# Altium PCB DC-DC_Conv_MCU.PcbDoc (part 1 of 2)
Units mm, origin at the board's own origin, x right, y up, seen from the top; angles counter-clockwise.
Board outline 149.01 x 76.01 mm, 2 copper layers (Top Layer, Bottom Layer); 299 components, 168 nets, 857 pads, 0 vias.
Unrouted connection lines stored in the file: 625.
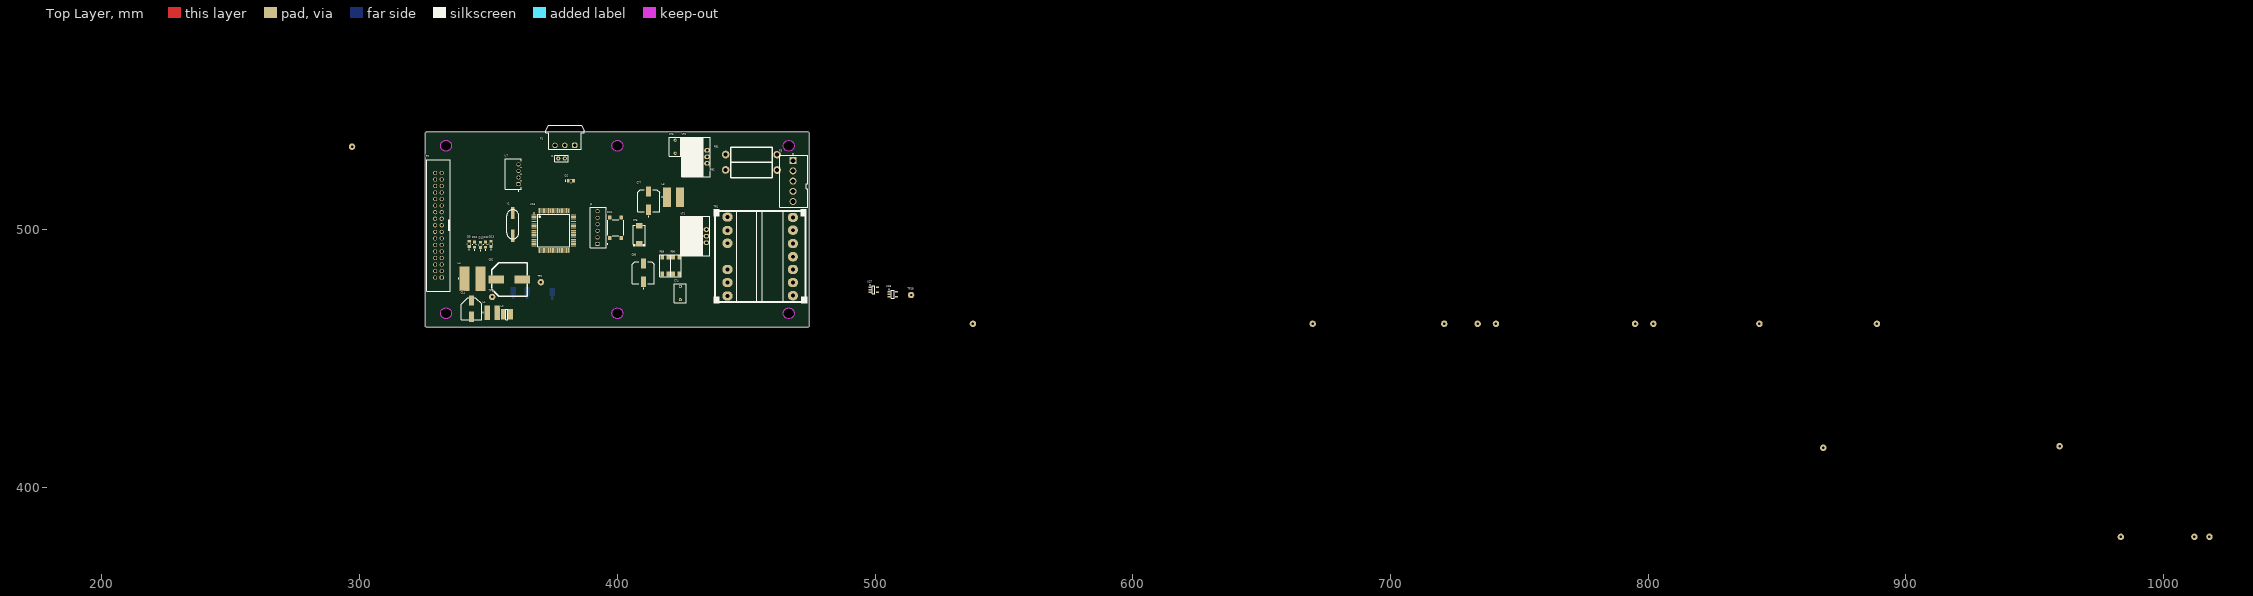
[diagram p0: Top Layer view]
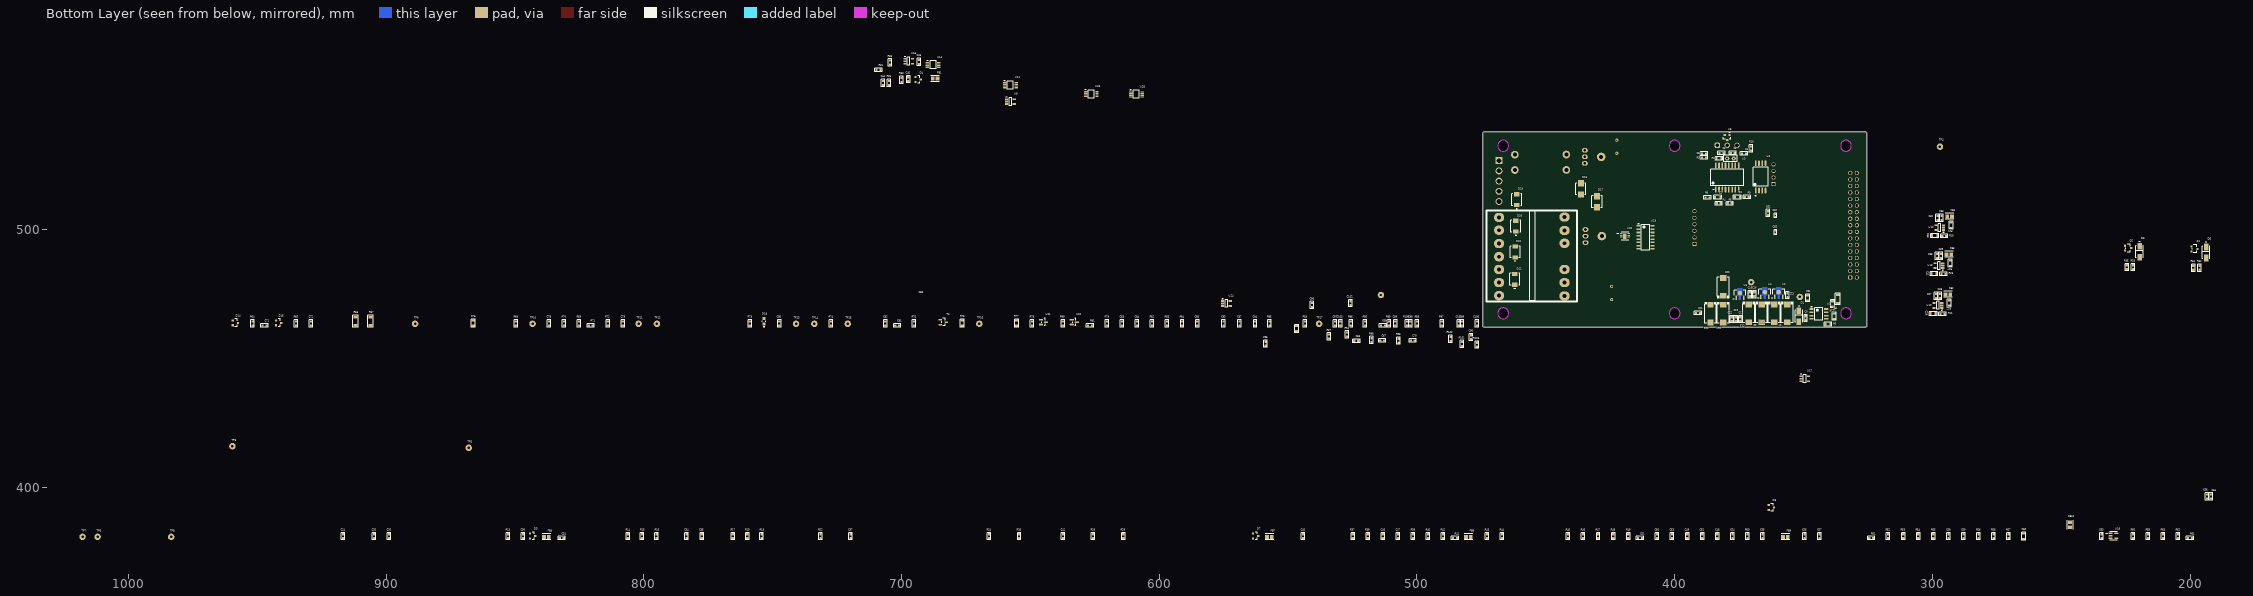
[diagram p1: Bottom Layer view, seen from below]

## Layer stack, top to bottom
Top Solder: solder mask 0.0102, Solder Resist, Dk 3.5
Top Layer: signal copper 0.0356
Dielectric 1: dielectric 0.32, FR-4, Dk 4.8
Bottom Layer: signal copper 0.0356
Bottom Solder: solder mask 0.0102, Solder Resist, Dk 3.5

## Board outline
325.493,462.5 325.493,537.5 325.495,537.505 325.995,538.005 326,538.007 474,538.007 474.005,538.005 474.505,537.505 474.507,537.5 474.507,462.5 474.505,462.495 474.005,461.995 474,461.993 326,461.993 325.995,461.995
cut-out: 466.5,530.4 cw(c466.5,532.5) 464.4,532.5 cw(c466.5,532.5) 466.5,534.6 cw(c466.5,532.5) 468.6,532.5 cw(c466.5,532.5)
cut-out: 466.5,465.4 cw(c466.5,467.5) 464.4,467.5 cw(c466.5,467.5) 466.5,469.6 cw(c466.5,467.5) 468.6,467.5 cw(c466.5,467.5)
cut-out: 400,465.4 cw(c400,467.5) 397.9,467.5 cw(c400,467.5) 400,469.6 cw(c400,467.5) 402.1,467.5 cw(c400,467.5)
cut-out: 400,530.4 cw(c400,532.5) 397.9,532.5 cw(c400,532.5) 400,534.6 cw(c400,532.5) 402.1,532.5 cw(c400,532.5)
cut-out: 333.5,465.4 cw(c333.5,467.5) 331.4,467.5 cw(c333.5,467.5) 333.5,469.6 cw(c333.5,467.5) 335.6,467.5 cw(c333.5,467.5)
cut-out: 333.5,530.4 cw(c333.5,532.5) 331.4,532.5 cw(c333.5,532.5) 333.5,534.6 cw(c333.5,532.5) 335.6,532.5 cw(c333.5,532.5)

## Design rules (kind name [scope] priority, off if disabled: settings)
Clearance [All] p1: gap=0.1 ignorepadtopadclearanceinfootprint=FALSE except(0.15: Arc-Arc Arc-Track Arc-Fill Arc-Poly Arc-Region Track-Track Track-Fill Track-Poly Track-Region)
PolygonConnect [All] p1: connectstyle=Relief reliefconductorwidth=0.254 reliefentries=4 polygonreliefangle="90 Angle" airgapwidth=0.254
RoutingVias [All] p1: holewidth=0.711 width=1.27 viastyle="Through Hole" minholewidth=0.711 minwidth=1.27 maxholewidth=0.711 maxwidth=1.27
SolderMaskExpansion [All] p1: expansion=0.102 istentingtop=FALSE
SupplyNets "Schematic Supply Nets_9" [InNet('+3V3')] p1: voltage=0.000
SupplyNets "Schematic Supply Nets_8" [InNet('VCC')] p2: voltage=0.000
SupplyNets "Schematic Supply Nets_7" [InNet('GND_ISOL')] p3: voltage=0.000
SupplyNets "Schematic Supply Nets_6" [InNet('+3V3_MCU')] p4: voltage=0.000
SupplyNets "Schematic Supply Nets_5" [InNet('3v3')] p5: voltage=0.000
SupplyNets "Schematic Supply Nets_4" [InNet('GND')] p6: voltage=0.000
SupplyNets "Schematic Supply Nets_3" [InNet('+5')] p7: voltage=0.000
SupplyNets "Schematic Supply Nets_1" [InNet('+5V')] p8: voltage=0.000
SupplyNets "Schematic Supply Nets" [InNet('+12')] p9: voltage=0.000
Width [All] p1: maxlimit=0.254 minlimit=0.254 preferedwidth=0.254
30 further rules are at their usual default settings.

## Components (designator, comment, footprint, x,y, rotation, side; value= is the part's Value field where it differs from the comment)
C1 "0.01uF" CAP-0805 375.666,512.572 r180 bottom
C2 "2.2uF" CAP-0805 383.286,512.445 r0 bottom
C3 "10nF" CAP-0603 377.444,529.717 r180 bottom
C4 "100nF" CAP-0603 373.126,529.463 r180 bottom
C5 "1nF" CAP-0603 381.762,529.717 r180 bottom
C6 "1uF" CAP-0603 388.62,529.463 r180 bottom
C7 "100uF_16V" CAP-TAN-D 356.362,467.487 r270 bottom
C8 "100uF_16V" CAP-TAN-D 366.268,467.487 r270 bottom
C9 "470pF" CAP-0603 349.123,465.582 r270 bottom
C10 "100uF_16V" CAP-TAN-D 361.315,467.487 r270 bottom
C11 "0.1uF" CAP-0603 374.523,465.201 r90 bottom
C12 "0.1uF" CAP-0603 356.235,474.472 r270 bottom
C13 "100uF_16V" CAP-TAN-D 371.221,467.487 r270 bottom
C14 "330uF 25V" CAP_SMD_Size_E 343.408,469.265 r90 top
C15 "0.47uF" CAP-0805 338.709,471.17 r270 bottom
C16 "0.1uF" CAP-0603 369.062,474.853 r90 bottom
C17 "100uF_16V" CAP-TAN-D 381.127,467.36 r270 bottom
C18 "0.1uF" CAP-0603 370.84,474.853 r90 bottom
C19 "0.1uF" CAP-0603 376.174,465.201 r90 bottom
C20 "100uF_16V" CAP-TAN-D 381.127,477.774 r90 bottom
C21 "0.1uF" CAP-0603 390.906,467.614 r180 bottom
C22 "0.1uF" CAP-0603 377.825,465.201 r90 bottom
C23 "100uF_16V" CAP-TAN-D 386.08,467.36 r270 bottom
C24 "0.1uF" CAP-0603 916.686,381 r90 bottom
C25 "1uF" CAP-0603 904.621,381 r90 bottom
C26 "0.1uF" CAP-0603 898.779,381 r90 bottom
C27 "0.01uF" CAP-0603 298.577,474.218 r90 bottom
C28 "2.2uF" CAP-0603 297.053,474.218 r90 bottom
C29 "1nF" CAP-0805 299.72,467.36 r180 bottom
C30 "0.1uF" CAP-0603 846.836,381 r90 bottom
C31 "1uF" CAP-0603 831.85,380.238 r180 bottom
C32 "0.01uF" CAP-0603 297.942,504.444 r90 bottom
C33 "2.2uF" CAP-0603 296.418,504.444 r90 bottom
C34 "330pF" CAP-0603 783.336,381 r90 bottom
C35 "330pF" CAP-0603 777.494,381 r90 bottom
C36 "1nF" CAP-0805 299.085,497.586 r180 bottom
C37 "1uF" CAP-0603 719.709,381 r90 bottom
C38 "0.01uF" CAP-0603 298.196,489.712 r90 bottom
C39 "2.2uF" CAP-0603 296.672,489.712 r90 bottom
C40 "330pF" CAP-0603 697.357,558.292 r90 bottom
C41 "1nF" CAP-0805 299.339,482.854 r180 bottom
C42 "330pF" CAP-0603 637.286,381 r90 bottom
C43 "0.1uF" CAP-0603 693.166,565.023 r90 bottom
C44 "1uF" CAP-0603 707.136,556.895 r90 bottom
C45 "0.1uF" CAP-0603 544.195,381 r90 bottom
C46 "1uF" CAP-0603 513.207,381 r90 bottom
C47 "0.1uF" CAP-0603 507.365,381 r90 bottom
C48 "100nF" CAP-0603 383.413,381 r90 bottom
C49 "100nF" CAP-0603 395.097,381 r90 bottom
C50 "100nF" CAP-0603 406.781,381 r90 bottom
C51 "1uF" CAP-0603 413.385,380.238 r180 bottom
C52 "100nF" CAP-0603 389.255,381 r90 bottom
C53 "100nF" CAP-0603 400.939,381 r90 bottom
C54 "100nF" CAP-0603 377.571,381 r90 bottom
C55 "1uF" CAP-0603 365.887,381 r90 bottom
C56 "330pF" CAP-0603 349.631,381 r90 bottom
C57 "0.1uF" CAP-0603 343.789,381 r90 bottom
C58 "330pF" CAP-0603 293.751,381 r90 bottom
C59 "0.1uF" CAP-0603 287.909,381 r90 bottom
C60 "2.2uF" CAP-0805 264.541,381 r90 bottom
C61 "100nF" CAP-0603 363.728,506.349 r270 bottom
C62 "16pF" CAP-0402 360.934,505.46 r90 bottom
C63 "1uF" CAP-0603 234.315,381 r90 bottom
C64 "0.1uF" CAP-0603 191.897,396.367 r90 bottom
C65 "16pF" CAP-0402 360.934,498.975 r90 bottom
C66 "0.1uF" CAP-0603 193.421,396.367 r90 bottom
C67 "1uF" CAP-0603 513.461,456.946 r180 bottom
C68 "1uF" CAP-0603 523.507,456.819 r180 bottom
C69 "0.1uF" CAP-0603 513.207,462.788 r180 bottom
C70 "0.1uF" CAP-0603 501.637,456.946 r180 bottom
C71 "10nF" CAP-0603 947.166,462.788 r180 bottom
C72 "10nF" CAP-0603 929.132,463.55 r90 bottom
C73 "63V 0.01UF" FKP2D011001A00JSSD 422.402,532.13 r90 top
C74 "63V 0.01UF" FKP2D011001A00JSSD 424.434,475.361 r90 top
C75 "100uF_16V" CAP-TAN-D 408.432,497.967 r90 top
C76 "0.01uF" CAP-0805 866.14,463.677 r90 bottom
C77 "330uF_25V" CAP_SMD_Size_G 412.115,511.175 r90 top
C78 "0.1uF" CAP-0603 836.803,463.55 r90 bottom
C79 "100nF" CAP-0603 808.101,463.55 r90 bottom
C80 "100nF" CAP-0603 747.395,463.55 r90 bottom
C81 "0.1uF" CAP-0603 701.675,462.788 r180 bottom
C82 "0.01uF" CAP-0603 706.247,463.55 r90 bottom
C83 "100nF" CAP-0603 614.426,463.55 r90 bottom
C84 "2.2nF" CAP-0603 608.584,463.55 r90 bottom
C85 "0.01uF" CAP-0603 585.216,463.55 r90 bottom
C86 "470uF_25V" CAP_SMD_Size_G 410.083,483.235 r90 top
C87 "100nF" CAP-0603 568.833,463.55 r90 bottom
C88 "100nF" CAP-0805 546.608,461.534 r90 bottom
C89 "470 pF" CAP-0603 482.473,463.55 r90 bottom
C90 "0.47uF" CAP-0603 479.044,458.216 r90 bottom
C91 "0.1uF" CAP-0805 348.361,473.456 r270 bottom
C92 "1000uF_25V" CAP_SMD_SIZE_H 358.013,480.568 r180 top
C93 "1uF" CAP-0603 575.056,463.55 r90 bottom
C94 "0.1uF" CAP-0603 562.737,463.55 r90 bottom
C95 "1uF" CAP-0603 558.673,455.676 r90 bottom
C96 "330pF" CAP-0603 540.639,470.662 r90 bottom
C97 "330pF" CAP-0603 531.749,463.55 r90 bottom
C98 "0.1uF" CAP-0603 502.539,463.55 r90 bottom
C99 "1uF" CAP-0603 508.381,463.55 r90 bottom
C100 "0.1uF" CAP-0603 476.631,463.55 r90 bottom
C101 "1uF" CAP-0603 483.743,463.55 r90 bottom
C102 "0.1uF" CAP-0603 525.78,471.411 r90 bottom
C103 "1uF" CAP-0603 529.717,463.55 r90 bottom
D1 "ES1G" FP-403AE-MFG 351.79,466.344 r270 bottom
D2 "LED_BLUE" LED_BLUE 381.982,518.922 r0 top
D3 "BAT54S-7-F" FP-SOT23-MFG#1 843.153,381.127 r180 bottom
D4 "BAT54S-7-F" FP-SOT23-MFG#1 693.547,558.165 r180 bottom
D5 "SS14" DO-214-AC 193.802,491.109 r90 bottom
D6 "SS14" DO-214-AC 219.583,491.363 r90 bottom
D7 "BAT54S-7-F" FP-SOT23-MFG#1 562.61,381.127 r180 bottom
D8 "BAT54S-7-F" FP-SOT23-MFG#1 362.458,392.176 r180 bottom
D9 "LED_GREEN" LED_GREEN 342.519,494.411 r90 top
D10 "LED_GREEN" LED_GREEN 344.551,494.157 r90 top
D11 "LED_RED" LED_RED 346.964,494.03 r90 top
D12 "LED_RED" LED_RED 348.869,494.157 r90 top
D13 "LED_YELLOW" LED_YELLOW 351.028,494.411 r90 top
D14 "BAT54S-7-F" FP-SOT23-MFG#1 958.469,463.804 r180 bottom
D15 "BAT54S-7-F" FP-SOT23-MFG#1 941.705,463.804 r180 bottom
D16 "SMBJ33CA-13-F" FP-SMB-CA-MFG 436.372,515.747 r90 bottom
D17 "SMBJ33CA-13-F" FP-SMB-CA-MFG 430.149,510.794 r90 bottom
D18 "LED_RED" LED_RED 753.364,464.439 r90 bottom
D19 "STTH212U" FP-SMB-MFG 461.264,511.605 r90 bottom
D20 "STTH212U" FP-SMB-MFG 461.645,501.318 r90 bottom
D21 "STTH212U" FP-SMB-MFG 462.026,480.695 r90 bottom
D22 "STTH212U" FP-SMB-MFG 461.899,491.285 r90 bottom
FB1 "BLM21PG221SN1D" FP-BLM21-0_2-t0_85-e0_5-IPC_A 686.943,558.546 r180 bottom
FB2 "BLM21PG221SN1D" FP-BLM21-0_2-t0_85-e0_5-IPC_A 293.968,474.853 r180 bottom
FB3 "BLM21PG221SN1D" FP-BLM21-0_2-t0_85-e0_5-IPC_A 837.819,380.746 r180 bottom
FB4 "BLM21PG221SN1D" FP-BLM21-0_2-t0_85-e0_5-IPC_A 293.333,505.079 r180 bottom
FB5 "BLM21PG221SN1D" FP-BLM21-0_2-t0_85-e0_5-IPC_A 293.587,490.347 r180 bottom
FB7 "BLM21PG221SN1D" FP-BLM21-0_2-t0_85-e0_5-IPC_A 557.276,380.746 r180 bottom
FB8 "BLM21PG221SN1D" FP-BLM21-0_2-t0_85-e0_5-IPC_A 480.06,380.746 r180 bottom
FB9 "BLM21PG221SN1D" FP-BLM21-0_2-t0_85-e0_5-IPC_A 356.997,380.746 r180 bottom
FB10 "BLM21PG221SN1D" FP-BLM21-0_2-t0_85-e0_5-IPC_A 246.507,385.445 r90 bottom
J1 "Jumper 1x2.54" Jumper_2.54 378.333,527.558 r180 top
J2 "KF2510 Connector 2.54mm" Sullins_SWR25X-NRTC-S06-ST-BA_MFG 392.603,500.761 r90 top
L1 "470µH" WE-PD2_5848 351.409,467.741 r0 top
L2 "220uH" Coil_4.5x4.5_mm 357.124,467.106 r0 top
L3 "330µH, 0.38A" WE-PD2_7850 421.767,512.572 r0 top
L4 "27µH, 1.95A" WE-PD2_1054 343.789,480.949 r0 top
P1 "691305340003" 691305340003 379.603,535.838 r180 top
P2 "61203421621" 61203421621 330.581,501.65 r90 top
P3 "645005114822" 645005114822 468.376,518.795 r90 top
Q1 "AO3400A" FP-SOT23-MFG#2 198.247,492.506 r180 bottom
Q2 "AO3400A" FP-SOT23-MFG#2 224.028,492.76 r180 bottom
R1 "0.33" RES-1206 336.677,473.075 r270 bottom
R2 "120" RES-0805 382.778,527.558 r180 bottom
R3 "10K" RES-0603 388.62,527.939 r0 bottom
R4 "10K" RES-0603 382.905,510.159 r180 bottom
R5 "10K" RES-0603 378.587,510.159 r180 bottom
R6 "6.8K" RES-0805 340.487,463.296 r180 bottom
R7 "1.2K" RES-0805 338.074,466.344 r270 bottom
R8 "220" RES-0603 387.223,512.445 r180 bottom
R9 "10K" RES-0603 371.983,512.572 r180 bottom
R10 "10K" RES-0603 370.332,531.495 r90 bottom
R11 "100" RES-0603 296.037,467.233 r180 bottom
R12 "100K" RES-0805 293.37,471.424 r270 bottom
R13 "6.6K 1%" RES-0603 852.678,381 r90 bottom
R14 "50" RES-0603 806.196,381 r90 bottom
R15 "10K 1%" RES-0603 800.608,381 r90 bottom
R16 "10K 1%" RES-0603 795.02,381 r90 bottom
R17 "10K 1%" RES-0603 765.429,381 r90 bottom
R18 "6.6K 1%" RES-0603 754.253,381 r90 bottom
R19 "20K  1%" RES-0603 759.841,381 r90 bottom
R20 "100" RES-0603 295.402,497.459 r180 bottom
R21 "100K" RES-0805 292.735,501.65 r270 bottom
R22 "10K" RES-0603 731.393,381 r90 bottom
R23 "100" RES-0603 295.656,482.727 r180 bottom
R24 "6.6K 1%" RES-0603 665.988,381 r90 bottom
R25 "50" RES-0603 704.85,556.895 r90 bottom
R26 "10K 1%" RES-0603 654.304,381 r90 bottom
R27 "100K" RES-0805 292.989,486.918 r270 bottom
R28 "10K 1%" RES-0603 625.602,381 r90 bottom
R29 "10K 1%" RES-0603 613.918,381 r90 bottom
R30 "20K  1%" RES-0603 700.024,558.038 r90 bottom
R31 "6.6K 1%" RES-0603 708.914,561.975 r180 bottom
R32 "100" RES-0603 196.342,485.14 r90 bottom
R33 "100" RES-0603 222.123,485.394 r90 bottom
R34 "10K" RES-0603 198.755,485.14 r90 bottom
R35 "10K" RES-0603 224.536,485.394 r90 bottom
R36 "10K" RES-0603 704.469,564.769 r90 bottom
R37 "10K" RES-0603 524.891,381 r90 bottom
R38 "6.6K 1%" RES-0603 519.049,381 r90 bottom
R39 "50" RES-0603 501.523,381 r90 bottom
R40 "27" RES-0603 495.681,381 r90 bottom
R41 "10K 1%" RES-0603 485.267,380.238 r180 bottom
R42 "10K 1%" RES-0603 489.839,381 r90 bottom
R43 "27" RES-0603 472.821,381 r90 bottom
R44 "27" RES-0603 466.979,381 r90 bottom
R45 "27" RES-0603 441.325,381 r90 bottom
R46 "27" RES-0603 435.483,381 r90 bottom
R47 "27" RES-0603 429.641,381 r90 bottom
R48 "27" RES-0603 423.799,381 r90 bottom
R49 "27" RES-0603 417.957,381 r90 bottom
R50 "10K 1%" RES-0603 371.729,381 r90 bottom
R51 "20K  1%" RES-0603 323.723,380.238 r180 bottom
R52 "20K" RES-0603 317.119,381 r90 bottom
R53 "6.6K 1%" RES-0603 311.277,381 r90 bottom
R54 "10K" RES-0603 305.435,381 r90 bottom
R55 "10K" RES-0603 299.593,381 r90 bottom
R56 "6.6K 1%" RES-0603 282.067,381 r90 bottom
R57 "50" RES-0603 270.383,381 r90 bottom
R58 "10K 1%" RES-0603 276.225,381 r90 bottom
R59 "220" RES-0603 216.281,381 r90 bottom
R60 "220" RES-0603 222.123,381 r90 bottom
R61 "220" RES-0603 200.025,380.238 r180 bottom
R62 "220" RES-0603 204.597,381 r90 bottom
R63 "220" RES-0603 210.439,381 r90 bottom
R64 "10K" RES-0603 951.738,463.55 r90 bottom
R65 "10K" RES-0603 934.974,463.55 r90 bottom
R66 "10 OMH" RES-1206 911.86,464.439 r90 bottom
R67 "10 OMH" RES-1206 906.018,464.439 r90 bottom
R68 "10K" RES-0603 849.63,463.55 r90 bottom
R69 "2K" RES-0603 825.119,463.55 r90 bottom
R70 "2K" RES-0603 830.961,463.55 r90 bottom
R71 "820" RES-0603 820.547,462.788 r180 bottom
R72 "200K" RES-0603 813.943,463.55 r90 bottom
R73 "200K" RES-0603 758.825,463.55 r90 bottom
R74 "1K" RES-0603 727.329,463.55 r90 bottom
R75 "1K" RES-0603 695.071,463.55 r90 bottom
R76 "10" RES-0805 676.402,463.677 r90 bottom
R77 "10" RES-0805 655.32,463.677 r90 bottom
R78 "10K" RES-0603 649.351,463.55 r90 bottom
R79 "10K" RES-0603 620.268,463.55 r90 bottom
R80 "6.2K" RES-0603 637.413,463.55 r90 bottom
R81 "10" RES-0603 626.872,462.788 r180 bottom
R82 "2K" RES-0603 602.742,463.55 r90 bottom
R83 "1K" RES-0603 596.9,463.55 r90 bottom
R84 "1K" RES-0603 591.058,463.55 r90 bottom
R85 "10" RES-0603 557.149,463.55 r90 bottom
R86 "1K" RES-0603 525.653,463.55 r90 bottom
R87 "1K" RES-0603 534.162,458.47 r90 bottom
R88 "1K" RES-0603 499.999,463.55 r90 bottom
R89 "4" RES-2512 418.592,486.029 r90 top
R90 "4" RES-2512 422.783,486.029 r90 top
R91 "RES_100" RES-2W 452.12,529.082 r180 top
R92 "RES_100" RES-2W 452.12,523.113 r180 top
R93 "10K 1%" RES-0603 543.433,463.55 r90 bottom
R94 "10K 1%" RES-0603 527.05,459.232 r90 bottom
R95 "20K  1%" RES-0603 520.065,463.55 r90 bottom
R96 "6.6K 1%" RES-0603 507.111,456.819 r90 bottom
R97 "10K" RES-0603 490.347,463.55 r90 bottom
R98 "10K" RES-0603 517.652,457.073 r90 bottom
R99 "10K" RES-0603 510.921,463.55 r90 bottom
R100 "10K" RES-0603 503.809,463.55 r90 bottom
R101 "10K" RES-0603 482.473,455.549 r90 bottom
R102 "10K" RES-0603 486.918,457.581 r90 bottom
R103 "15K" RES-0603 476.631,455.295 r90 bottom
SW1 "430152050826" 430152050826 399.288,500.634 r90 top
T2 "BC847C" SOT23-3_IPC_A 683.768,464.058 r180 bottom
TP1 "Test_Point_PCB" Test_Point 351.409,473.837 r0 top
TP2 "Test_Point_PCB" Test_Point 370.332,479.552 r0 top
TP3 "Test_Point_PCB" Test_Point 959.612,415.925 r180 bottom
TP4 "Test_Point_PCB" Pin_Test_Point(Orange) 297.053,532.13 r180 bottom
TP5 "Test_Point_PCB" Test_Point 867.918,415.29 r180 bottom
TP6 "Test_Point_PCB" Test_Point 1011.936,380.746 r180 bottom
TP7 "Test_Point_PCB" Test_Point 1017.778,380.746 r180 bottom
TP8 "Test_Point_PCB" Test_Point 983.361,380.746 r180 bottom
TP9 "Test_Point_PCB" Test_Point 888.746,463.423 r180 bottom
TP10 "Test_Point_PCB" Test_Point 843.153,463.423 r90 bottom
TP11 "Test_Point_PCB" Test_Point 802.005,463.423 r90 bottom
TP12 "" Test_Point 794.893,463.423 r90 bottom
TP13 "" Test_Point 740.918,463.423 r90 bottom
TP14 "" Test_Point 733.806,463.423 r90 bottom
TP15 "" Test_Point 720.852,463.423 r90 bottom
TP16 "" Test_Point 669.798,463.423 r90 bottom
TP17 "" Test_Point 537.972,463.423 r90 bottom
TP18 "" Test_Point 513.969,474.599 r90 top
TR1 "Transformer 2xI , 1xII" TRANS_ETD_29 455.168,488.823 r0 top
U1 "MC34063" SOIC-8_M 344.043,467.233 r180 bottom
U2 "AMS1117-3.3" SOT-89 359.64,475.745 r180 bottom
U3 "ADM2687E" ADI-RI-16-2_M 379.603,520.192 r90 bottom
U4 "AMS1117-3.3" SOT-89 364.998,475.742 r180 bottom
U5 "PSM712-LF-T7" PRKT-SOT23-3_V 379.603,535.686 r270 bottom
U6 "AMS1117-5" SOT-89 374.65,475.361 r180 bottom
U7 "B0505S-1W" B0505S-1W 359.537,521.462 r90 top
U8 "ISO1042BDWV" FP-DWV0008A-IPC_A 366.649,520.446 r90 bottom
U9 "OPA320AIDBVT" DBV0005A_M 657.733,549.656 r180 bottom
U10 "OPA320AIDBVT" DBV0005A_M 297.815,470.535 r0 bottom
U11 "OPA2376AIDGKR" DGK0008A_N 657.733,556.006 r180 bottom
U12 "OPA320AIDBVT" DBV0005A_M 297.18,500.761 r0 bottom
U13 "OPA320AIDBVT" DBV0005A_M 297.434,486.029 r0 bottom
U14 "OPA2376AIDGKR" DGK0008A_N 687.705,563.88 r180 bottom
U15 "OPA320AIDBVT" DBV0005A_M 697.23,565.277 r180 bottom
U16 "STM32G474VET6" FP-LQFP100-1L-IPC_A 375.285,499.618 r0 top
U17 "OPA320AIDBVT" DBV0005A_M 349.504,442.087 r180 bottom
U18 "REF2033AIDDCT" FP-DDC0005A-IPC_B 229.743,381.127 r180 bottom
U19 "TL494CDR" D0016A_N 411.284,496.951 r180 bottom
U20 "UCC27524DSDR" FP-DSD0008D-IPC_A 419.3,497.418 r180 bottom
U21 "TL431" TL431_SOT-23-3(A) 644.906,464.058 r180 bottom
U22 "TL431" TL431_SOT-23-3(A) 632.968,464.058 r180 bottom
U23 "OPA2376AIDGKR" DGK0008A_N 626.364,552.577 r180 bottom
U24 "OPA320AIDBVT" DBV0005A_M 573.913,471.297 r180 bottom
U25 "OPA2376AIDGKR" DGK0008A_N 608.838,552.45 r180 bottom
U26 "OPA320AIDBVT" DBV0005A_M 506.857,474.853 r0 top
U27 "OPA320AIDBVT" DBV0005A_M 499.442,476.631 r0 top
VT1 "MOSFET-N-GDS" TO-220_Bended_Rad 431.546,497.967 r90 top
VT2 "MOSFET-N-GDS" TO-220_Bended_Rad 431.8,528.701 r90 top
Y1 "XTAL 16Mhz" HC-49_SMD 359.41,502.031 r90 top

## Footprints (in the part's own frame and the unit in brackets; to place one, negate y for a bottom-side part, rotate by r counter-clockwise, add the part's x,y. Pads: shape width x height; smd on the part's side, far side on the other; paste and mask are expansions set on the pad)
61203421621 [mm] "34 pins, straight, gold plating"
  rrect50% 1.6x1.6 hole 1.1: 1(-20.32,-1.27)
  round 1.6 hole 1.1: 2(-20.32,1.27) 3(-17.78,-1.27) 4(-17.78,1.27) 5(-15.24,-1.27) 6(-15.24,1.27) 7(-12.7,-1.27) 8(-12.7,1.27) 9(-10.16,-1.27) 10(-10.16,1.27) 11(-7.62,-1.27) 12(-7.62,1.27) 13(-5.08,-1.27) 14(-5.08,1.27) 15(-2.54,-1.27) 16(-2.54,1.27) 17(0,-1.27) 18(0,1.27) 19(2.54,-1.27) 20(2.54,1.27) 21(5.08,-1.27) 22(5.08,1.27) 23(7.62,-1.27) 24(7.62,1.27) 25(10.16,-1.27) 26(10.16,1.27) 27(12.7,-1.27) 28(12.7,1.27) 29(15.24,-1.27) 30(15.24,1.27) 31(17.78,-1.27) 32(17.78,1.27) 33(20.32,-1.27) 34(20.32,1.27)
  silkscreen extent -25.52,-4.5 25.52,4.5, body extent -25.42,-4.42 25.42,4.75, height 9.13
430152050826 [mm] "SMD Tact Switch, body 6x6mm"
  rect 1.55x1.3 smd: A1(-3.975,2.25) A2(3.975,2.25) B1(-3.975,-2.25) B2(3.975,-2.25)
  silkscreen extent -3.1,-3.1 3.1,3.1, body extent -4.5,-3.1 4.5,3.1, height 5
645005114822 [mm] "3.96mm Male Locking Header, 5p"
  rect 2.7x2.7 hole 1.8: 1(7.92,0.225)
  round 2.7 hole 1.8: 2(3.96,0.225) 3(0,0.225) 4(-3.96,0.225) 5(-7.92,0.225)
  silkscreen extent -10.07,-5.45 10.66,5.45, body extent -9.96,-5.38 9.96,5.38, height 13.89
691305340003 [mm] "Horizontal PCB Header with Plastic Latch, pitch 3.81mm, 03p"
  rrect50% 2.1x2.1 hole 1.4: 1(-3.81,3.2)
  round 2.1 hole 1.4: 2(0,3.2) 3(3.81,3.2)
  silkscreen extent -7.47,-4.6 7.47,4.6, body extent -7.46,-4.6 7.46,4.6, height 7.25
ADI-RI-16-2_M [mm] "ADI-RI-16-2_M"
  oval 2.3x0.65 smd: 1(-4.7,4.445) 2(-4.7,3.175) 3(-4.7,1.905) 4(-4.7,0.635) 5(-4.7,-0.635) 6(-4.7,-1.905) 7(-4.7,-3.175) 8(-4.7,-4.445) 9(4.7,-4.445) 10(4.7,-3.175) 11(4.7,-1.905) 12(4.7,-0.635) 13(4.7,0.635) 14(4.7,1.905) 15(4.7,3.175) 16(4.7,4.445)
  silkscreen extent -4.82,-6.45 3.15,6.45, body extent -3.8,-6.45 3.8,6.45, height 2.64
B0505S-1W [mm]
  rect 1.55x1.55 hole 1 paste-2539.97 mask+0: 1(-3.81,-2.1)
  round 1.55 hole 1 paste-2539.97 mask+0: 2(-1.27,-2.1) 3(1.27,-2.1) 4(3.81,-2.1)
  silkscreen extent -6.52,-3.13 5.92,3.13, body extent -5.8,-3 5.8,3, height 10.41
CAP-0402 [mm]
  rect 0.5x0.6 smd: 1(-0.5,0) 2(0.5,0)
  silkscreen extent -0.95,-0.5 0.95,0.5, body extent -0.52,-0.27 0.53,0.28, height 0.55
CAP-0603 [mm]
  rect 0.85x0.9 smd: 1(-0.775,0) 2(0.775,0)
  silkscreen extent -1.43,-0.67 1.43,0.67, body extent -0.8,-0.4 0.8,0.4, height 0.8
CAP-0805 [mm]
  rect 0.8x1.25 smd mask+0.015: 1(-1,0) 2(1,0)
  silkscreen extent -1.52,-0.76 1.52,0.76, body extent -1,-0.62 1,0.63, height 0.8
CAP-TAN-D [mm]
  rect 2.2x2.5 smd: 1(-3.45,0) 2(3.45,0)
  silkscreen extent -4.5,-2.4 3.65,2.4, body extent -3.8,-2.3 3.8,2.3, height 4
CAP_SMD_Size_E [mm]
  rect 4x2 smd: 1(3.175,0) 2(-3.048,0)
  silkscreen extent -4.19,-3.94 4.32,4.06, body extent -4.25,-4 4.25,4, height 10.59
CAP_SMD_Size_G [mm]
  rect 4x2 smd paste+0 mask+0: 1(3.55,0) 2(-3.55,0)
  silkscreen extent -6.27,-4.25 4.25,4.25, body extent -5.8,-4.5 5.8,4.5, height 0.25
CAP_SMD_SIZE_H [mm]
  rect 6x3 smd: 1(5,0) 2(-5,0)
  silkscreen extent -6.99,-6.48 6.73,6.48, body extent -7,-6.44 7,6.44, height 13.62
Coil_4.5x4.5_mm [mm]
  rect 1.8x4 smd: 1(-1.397,0) 2(1.397,0)
  silkscreen extent -0.38,-2.03 0.38,2.03, body extent -2.07,-2.07 2.07,2.07, height 2.8
D0016A_N [mm] "SOIC, 16-Leads, Body 10x4mm, Pitch 1.27mm, IPC Medium Density"
  rrect17% 1.45x0.6 smd: 1(-2.725,4.445) 2(-2.725,3.175) 3(-2.725,1.905) 4(-2.725,0.635) 5(-2.725,-0.635) 6(-2.725,-1.905) 7(-2.725,-3.175) 8(-2.725,-4.445) 9(2.725,-4.445) 10(2.725,-3.175) 11(2.725,-1.905) 12(2.725,-0.635) 13(2.725,0.635) 14(2.725,1.905) 15(2.725,3.175) 16(2.725,4.445)
  silkscreen extent -2.85,-5 1.6,5.42, body extent -3,-4.95 3,4.95, height 1.59
DBV0005A_M [mm] "SOT23, 5-Leads, Body 3.05x1.75mm, Pitch 0.95mm, IPC Low Density"
  rrect15% 1.2x0.65 smd: 1(-1.475,0.95) 2(-1.475,0) 3(-1.475,-0.95) 4(1.475,-0.95) 5(1.475,0.95)
  silkscreen extent -1.6,-1.55 0.5,1.95, body extent -1.42,-1.46 1.42,1.46, height 1.08
DGK0008A_N [mm] "TSOP, 8-Leads, Body 3.1x3.1mm, Pitch 0.65mm, IPC Medium Density"
  rrect22% 1.35x0.45 smd: 1(-2.225,0.975) 2(-2.225,0.325) 3(-2.225,-0.325) 4(-2.225,-0.975) 5(2.225,-0.975) 6(2.225,-0.325) 7(2.225,0.325) 8(2.225,0.975)
  silkscreen extent -2.35,-1.55 1.15,1.9, body extent -2.45,-1.5 2.45,1.5, height 0.94
DO-214-AC [mm]
  rect 2.65x1.75 smd paste+0 mask+0: 1(-2.15,0) 2(2.15,0)
  silkscreen extent -2.37,-1.48 4.17,1.48, body extent -2.6,-1.36 2.6,1.36, height 2.5
FKP2D011001A00JSSD [mm] "FKP2D011001A00JSSD"
  round 1.224 hole 0.6: 1(-2.54,0) 2(2.54,0)
  silkscreen extent -3.68,-2.29 3.68,2.29, body extent -3.6,-2.25 3.6,2.25, height 6
FP-403AE-MFG [mm]
  rect 2.65x1.75 smd paste+0 mask+0: 1(-2.15,0) 2(2.15,0)
  silkscreen extent -4.17,-1.48 2.37,1.48, body extent -2.6,-1.36 2.6,1.36, height 2.5
FP-BLM21-0_2-t0_85-e0_5-IPC_A [mm]
  rect 1.455x1.556 smd paste+0 mask+0: 1(-0.926,0) 2(0.926,0)
  silkscreen extent -1.65,-1.18 1.65,1.18, body extent -1,-0.63 1,0.63, height 1.05
FP-DDC0005A-IPC_B [mm]
  rect 1.554x0.572 smd paste+0 mask+0: 1(-1.1,0.95)
  rrect100% 1.554x0.572 smd paste+0 mask+0: 2(-1.1,0) 3(-1.1,-0.95) 4(1.1,-0.95) 5(1.1,0.95)
  silkscreen extent -2.7,-1.7 1.4,1.7, body extent -1.4,-1.45 1.4,1.45, height 1.1
FP-DSD0008D-IPC_A [mm]
  rect 1.057x0.309 smd paste+0 mask+0: 1(-1.451,0.975)
  rrect100% 1.057x0.309 smd paste+0 mask+0: 2(-1.451,0.325) 3(-1.451,-0.325) 4(-1.451,-0.975) 5(1.451,-0.975) 6(1.451,-0.325) 7(1.451,0.325) 8(1.451,0.975)
  rect 1.3x2.25 smd paste-1000 mask+0: 9(0,0)
  silkscreen extent -2.9,-1.55 1.5,1.55, body extent -1.5,-1.5 1.5,1.5, height 0.8
FP-DWV0008A-IPC_A [mm]
  rect 2.254x0.622 smd paste+0 mask+0: 1(-5.301,1.905)
  rrect100% 2.254x0.622 smd paste+0 mask+0: 2(-5.301,0.635) 3(-5.301,-0.635) 4(-5.301,-1.905) 5(5.301,-1.905) 6(5.301,-0.635) 7(5.301,0.635) 8(5.301,1.905)
  silkscreen extent -7.45,-2.93 3.67,2.93, body extent -5.75,-2.93 5.75,2.93, height 2.8
FP-LQFP100-1L-IPC_A [mm]
  rect 1.955x0.312 smd paste+0 mask+0: 1(-7.675,6)
  rrect100% 1.955x0.312 smd paste+0 mask+0: 2(-7.675,5.5) 3(-7.675,5) 4(-7.675,4.5) 5(-7.675,4) 6(-7.675,3.5) 7(-7.675,3) 8(-7.675,2.5) 9(-7.675,2) 10(-7.675,1.5) 11(-7.675,1) 12(-7.675,0.5) 13(-7.675,0) 14(-7.675,-0.5) 15(-7.675,-1) 16(-7.675,-1.5) 17(-7.675,-2) 18(-7.675,-2.5) 19(-7.675,-3) 20(-7.675,-3.5) 21(-7.675,-4) 22(-7.675,-4.5) 23(-7.675,-5) 24(-7.675,-5.5) 25(-7.675,-6) 51(7.675,-6) 52(7.675,-5.5) 53(7.675,-5) 54(7.675,-4.5) 55(7.675,-4) 56(7.675,-3.5) 57(7.675,-3) 58(7.675,-2.5) 59(7.675,-2) 60(7.675,-1.5) 61(7.675,-1) 62(7.675,-0.5) 63(7.675,0) 64(7.675,0.5) 65(7.675,1) 66(7.675,1.5) 67(7.675,2) 68(7.675,2.5) 69(7.675,3) 70(7.675,3.5) 71(7.675,4) 72(7.675,4.5) 73(7.675,5) 74(7.675,5.5) 75(7.675,6)
  rrect100% 0.312x1.955 smd paste+0 mask+0: 26(-6,-7.675) 27(-5.5,-7.675) 28(-5,-7.675) 29(-4.5,-7.675) 30(-4,-7.675) 31(-3.5,-7.675) 32(-3,-7.675) 33(-2.5,-7.675) 34(-2,-7.675) 35(-1.5,-7.675) 36(-1,-7.675) 37(-0.5,-7.675) 38(0,-7.675) 39(0.5,-7.675) 40(1,-7.675) 41(1.5,-7.675) 42(2,-7.675) 43(2.5,-7.675) 44(3,-7.675) 45(3.5,-7.675) 46(4,-7.675) 47(4.5,-7.675) 48(5,-7.675) 49(5.5,-7.675) 50(6,-7.675) 76(6,7.675) 77(5.5,7.675) 78(5,7.675) 79(4.5,7.675) 80(4,7.675) 81(3.5,7.675) 82(3,7.675) 83(2.5,7.675) 84(2,7.675) 85(1.5,7.675) 86(1,7.675) 87(0.5,7.675) 88(0,7.675) 89(-0.5,7.675) 90(-1,7.675) 91(-1.5,7.675) 92(-2,7.675) 93(-2.5,7.675) 94(-3,7.675) 95(-3.5,7.675) 96(-4,7.675) 97(-4.5,7.675) 98(-5,7.675) 99(-5.5,7.675) 100(-6,7.675)
  silkscreen extent -7.8,-6.25 6.25,6.83, body extent -9.15,-9.15 9.15,9.15, height 0.25
FP-SMB-CA-MFG [mm]
  rect 2.5x2.3 smd paste+0 mask+0: 1(-2.15,0) 2(2.15,0)
  silkscreen extent -2.28,-1.97 2.28,1.97, body extent -2.65,-1.81 2.65,1.81, height 2.5
FP-SMB-MFG [mm]
  rect 1.62x2.18 smd paste+0 mask+0: 1(-2.11,0) 2(2.11,0)
  silkscreen extent -3.67,-1.97 2.3,1.97, body extent -2.68,-1.81 2.68,1.81, height 2.65
FP-SOT23-MFG#1 [mm]
  rect 0.9x0.8 smd paste+0 mask+0: 1(-1,0.95) 2(-1,-0.95) 3(1,0)
  silkscreen extent -0.18,-1.5 0.7,1.5, body extent -1.2,-1.45 1.2,1.45, height 1.1
FP-SOT23-MFG#2 [mm]
  rect 0.8x0.8 smd paste+0 mask+0: 1(-1.2,0.95) 2(-1.2,-0.95) 3(1.2,0)
  silkscreen extent -0.9,-1.55 0.9,1.55, body extent -1.41,-1.45 1.41,1.45, height 1.25
HC-49_SMD [mm]
  rect 4.7x1.524 smd: 1(-4.445,0) 2(4.445,0)
  silkscreen extent -5.68,-2.32 5.68,2.32, body extent -6.25,-2.22 6.25,2.22, height 3.55
Jumper_2.54 [mm]
  round 1.6 hole 0.762: 1(-1.27,0) 2(1.27,0)
  silkscreen extent -2.54,-1.27 2.54,1.27, body extent -2.6,-1.27 2.6,1.27, height 9
LED_BLUE [mm]
  rect 1.1x1.2 smd paste+0 mask+0: 1(1.05,0) 2(-1.05,0)
  silkscreen extent -2.27,-0.67 0.13,0.67, body extent -1,-0.63 1,0.63, height 0.8
LED_GREEN [mm]
  rect 1.1x1.2 smd paste+0 mask+0: 1(1.05,0) 2(-1.05,0)
  silkscreen extent -2.27,-0.67 0.13,0.67, body extent -1,-0.63 1,0.63, height 0.8
LED_RED [mm]
  rect 1.1x1.2 smd paste+0 mask+0: 1(1.05,0) 2(-1.05,0)
  silkscreen extent -2.27,-0.67 0.13,0.67, body extent -1.7,-0.77 1.7,0.77, height 0.25
LED_YELLOW [mm]
  rect 1.1x1.2 smd paste+0 mask+0: 1(1.05,0) 2(-1.05,0)
  silkscreen extent -2.27,-0.67 0.13,0.67, body extent -1,-0.63 1,0.63, height 0.8
Pin_Test_Point(Orange) [mm]
  round 2.5 hole 0.95: 1(0,0)
  body extent -1.3,-1.78 1.3,1.78, height 6.93
PRKT-SOT23-3_V [mm] "SOT23, 3-Leads, Body 2.92x1.3mm, Pitch 0.94mm"
  rect 0.84x0.84 smd: 1(-1,0.94) 3(1,0)
  rect 0.84x0.9 smd: 2(-1,-0.94)
  silkscreen extent -2.09,-1.46 0.65,1.46, body extent -0.65,-1.46 0.65,1.46, height 1.17
RES-2W [mm]
  round 3 hole 1.5: 1(-9.875,0.025) 2(10.1,-0.025)
  silkscreen extent -7.9,-2.93 8.13,2.95, body extent -9.86,-2.79 10.01,2.79, height 5.59
RES-0603 [mm]
  rect 0.85x0.9 smd: 1(-0.775,0) 2(0.775,0)
  silkscreen extent -1.43,-0.67 1.43,0.67, body extent -0.85,-0.45 0.85,0.45, height 0.55
RES-0805 [mm]
  rect 0.8x1.25 smd mask+0.015: 1(-1,0) 2(1,0)
  silkscreen extent -1.52,-0.76 1.52,0.76, body extent -1,-0.62 1,0.63, height 0.6
RES-1206 [mm]
  rect 1x1.6 smd: 1(-1.6,0) 2(1.6,0)
  silkscreen extent -2.29,-1.02 2.29,1.02, body extent -1.6,-0.8 1.6,0.8, height 0.6
RES-2512 [mm]
  rect 1.8x1.45 smd: 1(-3.275,-1.225) 1(-3.275,1.225) 2(3.275,-1.225) 2(3.275,1.225)
  silkscreen extent -4.28,-2.05 4.25,2.05, body extent -3.2,-1.6 3.2,1.6, height 0.6
SOIC-8_M [mm]
  rrect15% 1.65x0.65 smd: 1(-2.825,1.905) 2(-2.825,0.635) 3(-2.825,-0.635) 4(-2.825,-1.905) 5(2.825,-1.905) 6(2.825,-0.635) 7(2.825,0.635) 8(2.825,1.905)
  silkscreen extent -2.95,-2.5 1.6,2.9, body extent -3,-2.45 3,2.45, height 1.63
SOT23-3_IPC_A [mm]
  rect 1.308x0.616 smd paste+0 mask+0: 1(-1.175,0.95)
  rrect100% 1.308x0.616 smd paste+0 mask+0: 2(-1.175,-0.95) 3(1.175,0)
  silkscreen extent -0.65,-1.45 0.65,1.45, body extent -1.2,-1.45 1.2,1.45, height 1.1
SOT-89 [mm]
  rect 0.58x1.73 smd paste+0 mask+0: 1(-1.5,-1.781) 3(1.5,-1.781)
  round 1.74 smd paste+0 mask+0: 2(0,0)
  Top Layer region: -0.38,-2.646 -0.38,-1.146 -0.967,-1.146 -0.967,1.884 0.967,1.884 0.967,-1.146 0.38,-1.146 0.38,-2.646
  silkscreen extent -2.7,-2.47 2.3,1.15, body extent -2.25,-2.42 2.25,1.68, height 1.6
Sullins_SWR25X-NRTC-S06-ST-BA_MFG [mm]
  rect 1.55x1.55 hole 1 paste-2539.97 mask+0: 1(-6.35,0.3)
  round 1.55 hole 1 paste-2539.97 mask+0: 2(-3.81,0.3) 3(-1.27,0.3) 4(1.27,0.3) 5(3.81,0.3) 6(6.35,0.3)
  silkscreen extent -7.8,-3.68 7.8,3.05, body extent -7.9,-3.15 7.9,3.15, height 0.25
Test_Point [mm]
  round 2.5 hole 0.95: 1(0,0)
TL431_SOT-23-3(A) [mm]
  rect 1.659x0.627 smd paste+0 mask+0: 1(-0.977,0.915)
  rrect100% 1.659x0.627 smd paste+0 mask+0: 2(-0.977,-0.915) 3(0.977,0)
  silkscreen extent -0.65,-1.45 0.65,1.45, body extent -1.2,-1.45 1.2,1.45, height 1.1
TO-220_Bended_Rad [mil]
  oval 70x90 hole 40: 1(-120,-120) 2(-20,-120) 3(80,-120)
  round 130 hole 60: 2(-20,130)
  silkscreen extent -320,-170 280,270, body extent -315,-165 275,265, height 997
TRANS_ETD_29 [mm]
  oval 4x3.6 hole 1.5: 1(-12.446,16.002) 2(-12.446,10.795) 3(-12.446,5.842) 4(-12.446,-4.318) 5(-12.446,-9.398) 6(-12.446,-14.605) 7(12.954,-14.478) 8(12.954,-9.398) 9(12.954,-4.318) 10(12.954,0.635) 11(12.954,5.715) 12(12.954,10.922) 13(12.954,15.875)
  silkscreen extent -17.91,-17.53 18.54,19.05, body extent -17.27,-16.91 17.73,18.29, height 24.81
WE-PD2_1054 [mm] "SMD Power Inductor, 2-Leads, body 10x9mm"
  rect 3.75x9.5 smd: 1(-3.125,0) 2(3.125,0)
  silkscreen extent -5.62,-0.12 -5.37,0.12, body extent -5.04,-4.5 5.04,4.5, height 5.43
WE-PD2_5848 [mm] "SMD Power Inductor, 2-Leads, body 5.8x5.2mm"
  rect 2.15x5.5 smd: 1(-1.925,0) 2(1.925,0)
  silkscreen extent -3.67,-0.12 -3.42,0.12, body extent -2.9,-2.6 2.89,2.6, height 4.48
WE-PD2_7850 [mm] "SMD Power Inductor, 2-Leads, body 7.8x7mm"
  rect 3x7.5 smd: 1(-2.5,0) 2(2.5,0)
  silkscreen extent -4.59,-0.12 -4.34,0.12, body extent -3.81,-3.5 3.81,3.5, height 4.95

## Part data
C1 C2 C3 C4 C5 C6 C9 C11 C12 C15 C16 C18 C19 C21 C22 C24 C25 C26 C27 C28 C29 C30 C31 C32 C33 C34 C35 C36 C37 C38 C39 C40 C41 C42 C43 C44 C45 C46 C47 C48 C49 C50 C51 C52 C53 C54 C55 C56 C57 C58 C59 C60 C61 C62 C63 C64 C65 C66 C67 C68 C69 C70 C71 C72 C76 C78 C79 C80 C81 C82 C83 C84 C85 C87 C88 C89 C90 C91 C93 C94 C95 C96 C97 C98 C99 C100 C101 C102 C103: library part CAP-NON-POLAR
C7 C8 C10 C13 C14 C20 C23: library part CAP_POL_SMD
C17 C75 C77 C86: library part CAP-POLAR
C73 C74: library part CAP-NON-POLAR, "WIMA Film Capacitor FKP2 63V 0.01UF"
C92: library part CAP_POL_SMD, "1000uF_25V  12.5x13mm"
D1: "Ultrafast"
D2: library part LED, "0805", Manufacturer_Name="Wurth Elektronik", Manufacturer_Part_Number=151031YS06000, Mouser Part Number=710-151031YS06000, Datasheet Link=https://katalog.we-online.de/led/datasheet/151031YS06000.pdf, Geometry.Height=5.5mm, Mouser Price/Stock=https://www.mouser.co.uk/ProductDetail/Wurth-Elektronik/151031YS06000?qs=LlUlMxKIyB3xSYYW%252BcuBiQ%3D%3D
D3 D4 D7 D8 D14 D15: library part CMP-1667-00006-2, "DIODE ARRAY SCHOTTKY 30V SOT23-3", Average Rectified Current=200mA, Capacitance=10pF, Case/Package=SOT-23, Forward Voltage=800mV, Max Forward Surge Current (Ifsm)=600mA, Max Operating Temperature=150°C, Max Power Dissipation=200mW, Max Repetitive Reverse Voltage (Vrrm)=30V, Min Operating Temperature=-65°C, Package Quantity=3000, Peak Reverse Current=2uA, Contact Plating=Tin, Current Rating=200mA, Forward Current=200mA, Height=1mm, Lead Free="Lead Free", Length=2.9mm, Max Reverse Voltage (DC)=30V, Mount="Surface Mount", Number of Pins=3, Packaging="Tape and Reel", Peak Non-Repetitive Surge Current=600mA, Power Dissipation=200mW, Power Rating=200mW, Radiation Hardening=No, REACH SVHC="No SVHC", Reverse Recovery Time=5ns, Termination=SMD/SMT, Voltage Rating (DC)=30V, Weight=0.000282oz, Width=1.3mm
D9 D10 D11 D12 D13 D18: library part LED, Manufacturer_Name="Wurth Elektronik", Manufacturer_Part_Number=151031YS06000, Mouser Part Number=710-151031YS06000, Datasheet Link=https://katalog.we-online.de/led/datasheet/151031YS06000.pdf, Geometry.Height=5.5mm, Mouser Price/Stock=https://www.mouser.co.uk/ProductDetail/Wurth-Elektronik/151031YS06000?qs=LlUlMxKIyB3xSYYW%252BcuBiQ%3D%3D
D16 D17: "TVS DIODE 33V 53.3V SMB"
D19 D20 D21 D22: "DIODE GEN PURP 1.2KV 2A SMB"
FB1 FB2 FB3 FB4 FB5 FB7 FB8 FB9 FB10: "Chip Ferrite Bead, 0805, 220Ω @ 100MHz, 0.045Ω, 25%, 2A"
J2: library part SWR25X-NRTC-S06-ST-BA
L1: library part 744774033, "MSRH5D28-471MT", Case/Size Code=5848, DC Resistance=0.042Ω, DC Resistance Max=0.06Ω, Inductance=3.3µH, Manufacturer="Wurth Elektronik", Operating Temperature Max=125°C, Operating Temperature Min=-40°C, Rated Current=4A, Saturation Current=7.5A, Self Resonant Frequency=43MHz, Category="Unshielded Power Inductors", ComponentLink1Description="Website Link", ComponentLink1URL=https://www.we-online.com/redexpert/article/744774033?ad, ComponentLink2Description="Datasheet Link", ComponentLink2URL=https://www.we-online.com/redexpert/spec/744774033?ad, Height=4.5mm, Length=5.8mm, Manufacturer Part Number=744774033, Match Code=WE-PD2, Mount="Surface Mount", Packaging="Tape and Reel", Width=5.2mm, Simulation ModelName=5848_744774033_3.3u, Simulation ModelText=".subckt 5848_744774033_3.3u 1 2 / Rp 1 2 12000 / Cp 1 2 3.4p / Rs 1 N3 0.042 / L1 N3 2 3.3u / .ends 5848_744774033_3.3u", Simulation PortMap=(1:1),(2:2)
L2: library part Coil
L3: library part 744775239, "WE-PD2 SMT Power Inductor, size 7850, 390µH, 0.38A, 1.77Ω", Case/Size Code=7850, DC Resistance=1.151Ω, DC Resistance Max=1.77Ω, Inductance=390µH, Manufacturer="Wurth Elektronik", Operating Temperature Max=125°C, Operating Temperature Min=-40°C, Rated Current=0.38A, Saturation Current=0.43A, Self Resonant Frequency=3.9MHz, Category="Unshielded Power Inductors", ComponentLink1Description="Website Link", ComponentLink1URL=https://www.we-online.com/redexpert/article/744775239?ad, ComponentLink2Description="Datasheet Link", ComponentLink2URL=https://www.we-online.com/redexpert/spec/744775239?ad, Height=4.95mm, Length=7.8mm, Manufacturer Part Number=744775239, Match Code=WE-PD2, Mount="Surface Mount", Packaging="Tape and Reel", Width=7mm, Simulation ModelName=7850_744775239_390u, Simulation ModelText=".subckt 7850_744775239_390u 1 2 / Rp 1 2 180000 / Cp 1 2 5p / Rs 1 N3 1.151 / L1 N3 2 390u / .ends 7850_744775239_390u", Simulation PortMap=(1:1),(2:2)
L4: library part 744776127, "WE-PD2 SMT Power Inductor, size 1054, 27µH, 1.95A, 0.11Ω", Case/Size Code=1054, DC Resistance=0.063Ω, DC Resistance Max=0.11Ω, Inductance=27µH, Manufacturer="Wurth Elektronik", Operating Temperature Max=125°C, Operating Temperature Min=-40°C, Rated Current=1.95A, Saturation Current=1.98A, Self Resonant Frequency=15MHz, Category="Unshielded Power Inductors", ComponentLink1Description="Website Link", ComponentLink1URL=https://www.we-online.com/redexpert/article/744776127?ad, ComponentLink2Description="Datasheet Link", ComponentLink2URL=https://www.we-online.com/redexpert/spec/744776127?ad, Height=5.4mm, Length=10mm, Manufacturer Part Number=744776127, Match Code=WE-PD2, Mount="Surface Mount", Packaging="Tape and Reel", Width=9mm, Simulation ModelName=1054_744776127_27u, Simulation ModelText=".subckt 1054_744776127_27u 1 2 / Rp 1 2 22000 / Cp 1 2 4.7p / Rs 1 N3 0.0627 / L1 N3 2 27u / .ends 1054_744776127_27u", Simulation PortMap=(1:1),(2:2)
P1: "WR-TBL Series 3053 Horizontal PCB Header, THT, pitch 3.81mm, 3p", Manufacturer="Wurth Elektronik", Operating Temperature Max=105°C, Operating Temperature Min=-40°C, Rated Current=12A, Working Voltage=300V, Application=Pluggable, Category="Terminal Blocks", ComponentLink1Description="Website Link", ComponentLink1URL=https://www.we-online.com/redexpert/article/691305340003?ad, ComponentLink2Description="Datasheet Link", ComponentLink2URL=https://www.we-online.com/redexpert/spec/691305340003?ad, Manufacturer Part Number=691305340003, Match Code=WR-TBL, Modularity=No, Mount="Through Hole", Number of Pins=3, Number of Rows=1, Orientation=Horizontal, Packaging=Box, Pitch=3.81mm
P2: "WR-BHD Male Box Header, THT Straight, pitch 2.54 mm, 2 Rows, 34 Pins", Contact Resistance="20 mΩ", Insulation Resistance="1000 MΩ", Manufacturer="Wurth Elektronik", Max Operating Temperature="105 °C", Min Operating Temperature="-40 °C", Rated Current="3 A", Withstanding Voltage="500 V", Working Voltage="250 V", Category="Wire-to-Board Connector", ComponentLink1Description="Website Link", ComponentLink1URL=https://www.we-online.com/redexpert/article/61203421621?ad, ComponentLink2Description="Datasheet Link", ComponentLink2URL=https://www.we-online.com/redexpert/spec/61203421621?ad, Connectors.Match Code=WR-BHD, Gender=Male, Height="9.1 mm", Length="50.84 mm", Manufacturer Part Number=61203421621, Mount="Through Hole", Number of Pins=34, Number of Rows=2, Orientation=Straight, Packaging=Tray, Pitch="2.54 mm", Width="9.1 mm"
P3: "WR-WTB THT Male Vertical Locking Header, pitch 3.96mm, 5p", Contact Resistance=20mOhm, Operating Temperature="-40 to +105degC", Rated Current=7A, Withstanding Voltage=1500VAC, Working Voltage=250VAC, ComponentLink1Description=Manufacturer, ComponentLink1URL=http://www.we-online.de, ComponentLink2Description=Datasheet, ComponentLink2URL=https://www.we-online.com/catalog/datasheet/645005114822.pdf, Gender=Male, Mounting Technology=THT, Packaging=Bag, Part Number=645005114822, Pin Number=5, Pitch=3.96mm, Published Date="January 2020", Publisher="Wurth Elektronik", Type=Vertical
Q1 Q2: library part CMP-83955-000006-1, "MOSFET N-CH 30V 5.7A SOT23", Case/Package=SOT-23, Continuous Drain Current (ID)=5.7A, Drain to Source Voltage (Vdss)=30V, Gate to Source Voltage (Vgs)=12V, Input Capacitance=630pF, Max Operating Temperature=150°C, Max Power Dissipation=1.4W, Min Operating Temperature=-55°C, Lead Free="Lead Free", Mount="Surface Mount", Number of Elements=1, Number of Pins=3, Packaging="Tape and Reel", Power Dissipation=1.4W, Radiation Hardening=No, Rds On Max=26.5mR
R1 R2 R3 R4 R5 R6 R7 R8 R9 R10 R11 R12 R13 R14 R15 R16 R17 R18 R19 R20 R21 R22 R23 R24 R25 R26 R27 R28 R29 R30 R31 R32 R33 R34 R35 R36 R37 R38 R39 R40 R41 R42 R43 R44 R45 R46 R47 R48 R49 R50 R51 R52 R53 R54 R55 R56 R57 R58 R59 R60 R61 R62 R63 R64 R65 R66 R67 R68 R69 R70 R71 R72 R73 R74 R75 R76 R77 R78 R79 R80 R81 R82 R83 R84 R85 R86 R87 R88 R89 R90 R93 R94 R95 R96 R97 R98 R99 R100 R101 R102 R103: library part RES-CONST
R91 R92: library part RES_THT
SW1: "WS-TASV SMT Tact Switch, 6mm x 6mm, 260gf, SPST-NO, 12V, 50mA", Manufacturer="Wurth Elektronik", Max Operating Temperature=85°C, Min Operating Temperature=-40°C, Rated Current=50mA, Rated Voltage (DC)=12V, Category="Tact Switch", Circuit=SPST-NO, ComponentLink1Description="Website Link", ComponentLink1URL=https://www.we-online.com/redexpert/article/430152050826?ad, ComponentLink2Description="Datasheet Link", ComponentLink2URL=https://www.we-online.com/redexpert/spec/430152050826?ad, Contact Material="Stainless Steel", Contact Plating=Silver, Height=5mm, Length=6mm, Manufacturer Part Number=430152050826, Match Code=WS-TASV, Mount="Surface Mount", Operation Force=260gf, Packaging="Tape and Reel", Terminal Material="Copper Alloy", Terminal Plating=Silver, Washable=No, Width=6mm
TP1 TP2 TP3 TP4 TP5 TP6 TP7 TP8 TP9 TP10 TP11 TP12 TP13 TP14 TP15 TP16 TP17 TP18: library part TP_PCB?, "Test_Point"
U2 U4 U6: library part AMS1117
U5: library part CMP-2000-07553-1, "TVS Array - Asymmetrical Data Line Protector, 600 W, 7.5 V, -55 to 150 degC, 3-Pin SOT23, RoHS, Tape and Reel", Capacitance=75pF, Case\/Package=SOT-23, Clamping Voltage=17V, Current=20uA, Manufacturer="Protek Devices", Max Operating Temperature=150degC, Min Breakdown Voltage=7.5V, Min Operating Temperature=-55degC, Package Description="3-Pin Small Outline Transistor, Body 2.92 x 1.3 mm, Pitch 0.94 mm", Package Reference=SOT23-3, Power Dissipation=600W, Voltage=12V, Working Voltage=7V, Datasheet URL=www.protekdevices.com/xyz/documents/datasheets/psm712.pdf, Datasheet Version=10/2013, Depth=1.4mm, Direction=Bidirectional, Element Configuration=Dual, Lead Free=LeadFree, Leakage Current=20uA, Length=3.04mm, Manufacturer URL=http://www.protekdevices.com/, Mounting Technology=SurfaceMount, Number of Pins=3, Packaging=TapeandReel, Radiation Hardening=No, RoHSCompliant=True
U8: library part CMP-04872-000106-1, "ISO CAN TRANSCEIVER 5KVRMS", RoHS Compliant=Yes
U11 U14 U23 U25: "Precision, Low Noise, Low Quiescent Current Operational Amplifier, 2 to 5.5 V, -40 to 125 degC, 8-pin SOP (DGK8), Green (RoHS & no Sb/Br)"
U16: "STM32G474VET6   / IC MCU 32BIT 512KB FLASH 100LQFP"
U18: library part REF2033, "REF2033"
U19: library part CMP-0319-00950-2, "Pulse-Width-Modulation Control Circuit with Voltage Control, 45 % Duty Cycle, 0 to +70 degC, 16-pin SOIC (D), Green (RoHS & no Sb/Br)", Frequency(Max)(kHz)=300, Manufacturer="Texas Instruments", Rating=Military, Code_JEDEC=MS-012AC, ComponentLink1Description=Datasheet, ComponentLink1URL=http://www.ti.com/general/docs/lit/getliterature.tsp?genericPartNumber=TL494&fileType=pdf, Control Method=Voltage, DatasheetVersion=SLVS074E, Duty Cycle(Max)(%)=45, Eco-Plan="Green (RoHS & no Sb/Br)", Mounting Technology="Surface Mount", PackageDescription="16-Pin Plastic Small Outline Integrated Circuit, 9.9 x 3.9 mm, Pitch 1.27 mm Pitch", PackageReference=D0016A, PackageVersion="revM, Jun-2011", PartNumber=TL494CDR, Regulated Outputs(#)=2, SubFamily="PWM Controller", Topology="Boost, Buck, Flyback, Forward, Full-Bridge, Half-Bridge, Push-Pull"
U20: "IC GATE DVR LO-SIDE DL 5A 8SON"
U21 U22: library part TL431_SOT-23-3, "TL431_SOT-23-3"

## Nets (pads, with @x,y where several pads share a name; then routed paths per layer and width w, separated by ;. In a path a pad name is that pad's centre, name@x,y a point inside that pad or via, vN(x,y) a via of type N, cw(c..) or ccw(c..) an arc to the next point about the centre after c; other vN are vias at no path point)
3v3: C1.1 C2.1 C11.2 C13.1 C24.2 C25.2 C43.2 C44.2 C45.2 C46.2 C59.2 C93.2 C98.2 C99.2 D3.2 D4.2 D7.2 D8.2 D14.2 D15.2 R4.2 R5.2 R64.1 R65.1 R98.1 U2.2 U3.2 U3.7 U9.5 U15.5 U17.5 U24.5 U26.5
+3V3: FB2.2 FB4.2 FB5.2
+3V3_MCU: C16.2 C17.1 C18.2 C48.2 C49.2 C50.2 C52.2 C53.2 C57.1 C61.2 FB8.2 J2.1 R52.2 SW1.B1 SW1.B2 TP5.1 U4.2 U16.6 U16.24 U16.49 U16.64 U16.75 U16.100
+5: C102.2 C103.2 FB1.2 FB3.2 FB7.2 FB9.2 FB10.2 U27.5
+5V: C21.2 C23.1 C67.2 C70.2 U6.2 U7.2
+12: D5.2 D6.2
GND: C1.2 C2.2 C7.2 C8.2 C9.2 C10.2 C11.1 C12.1 C13.2 C14.2 C15.2 C16.1 C17.2 C18.1 C19.1 C20.2 C21.1 C22.1 C23.2 C24.1 C25.1 C26.1 C27.1 C28.1 C29.1 C30.1 C31.1 C32.1 C33.1 C34.1 C35.1 C36.1 C37.1 C38.1 C39.1 C40.1 C41.1 C42.1 C43.1 C44.1 C45.1 C46.1 C47.1 C48.1 C49.1 C50.1 C51.1 C52.1 C53.1 C54.1 C55.1 C56.1 C58.1 C59.1 C60.1 C61.1 C62.1 C63.1 C64.1 C65.2 C66.1 C67.1 C70.1 C71.1 C72.1 C75.2 C76.1 C77.2 C78.1 C81.1 C82.1 C83.1 C84.1 C85.1 C86.2 C87.1 C88.1 C89.1 C90.1 C91.1 C92.2 C93.1 C94.1 C95.1 C96.1 C97.1 C98.1 C99.1 C100.1 C101.1 C102.1 C103.1 D1.2 D2.2 D3.1 D4.1 D7.1 D8.1 D9.2 D10.2 D11.2 D12.2 D13.2 D14.1 D15.1 D16.1 D17.2 J2.6 P2.11 P2.19 P2.20 P2.25 P2.27 P2.29 P2.31 P2.33 Q1.2 Q2.2 R7.1 R9.1 R12.2 R19.2 R21.2 R27.2 R30.2 R34.1 R35.1 R51.2 R55.2 R78.1 R79.1 R80.1 R82.1 R83.1 R84.1 R86.1 R87.1 R89.1 R90.1 R95.2 R101.2 R102.2 T2.2 TP4.1 TP17.1 U1.4 U2.1 U3.1 U3.8 U4.1 U6.1 U7.1 U9.2 U10.2 U11.4 U12.2 U13.2 U14.4 U15.2 U16.23 U16.35 U16.48 U16.63 U16.74 U16.99 U17.2 U18.2 U19.7 U20.3 U20.9 U21.3 U22.3 U23.4 U24.2 U25.4 U26.2 U27.2
GND_ISOL: C3.2 C4.2 C5.2 C6.2 P1.2 R10.1 TP8.1 U3.9 U3.16 U5.3
NetC3_1: C3.1 C4.1 C5.1 C6.1 R3.2 U3.10 U3.15
NetC7_1: C7.1 C10.1 L1.2 L2.1 R6.1
NetC8_1: C8.1 C12.2 C19.2 C20.1 C22.2 L2.2 TP2.1 U2.3 U4.3 U6.3
NetC9_1: C9.1 U1.3
NetC26_2: C26.2 C37.2 FB1.1 U14.8
NetC27_2: C27.2 C28.2 FB2.1 U10.5
NetC29_2: C29.2 R11.1 U16.40
NetC30_2: C30.2 C31.2 FB3.1 U11.8
NetC32_2: C32.2 C33.2 FB4.1 U12.5
NetC34_2: C34.2 D3.3 R14.2 U16.29
NetC35_2: C35.2 R13.1 R16.2 U11.1
NetC36_2: C36.2 R20.1 U16.30
NetC38_2: C38.2 C39.2 FB5.1 U13.5
NetC40_2: C40.2 D4.3 R25.2 U16.20
NetC41_2: C41.2 R23.1 U16.21
NetC42_2: C42.2 R24.1 R28.2 U14.1
NetC47_2: C47.2 C55.2 FB7.1 U23.8
NetC51_2: C51.2 C54.2 FB8.1 U16.37
NetC56_2: C56.2 D7.3 R39.2 U16.33
NetC57_2: C57.2 R55.1 SW1.A1 SW1.A2 U16.95
NetC58_2: C58.2 R38.1 R42.2 U23.1
NetC60_2: C60.2 J2.5 R52.1 U16.14
NetC62_2: C62.2 U16.12 Y1.2
NetC63_2: C63.2 C64.2 FB10.1 U18.3 U18.4
NetC65_1: C65.1 U16.13 Y1.1
NetC66_2: C66.2 U16.36 U18.5
NetC68_1: C68.1 C69.1 U7.3 U8.5
NetC68_2: C68.2 C69.2 U7.4 U8.8
NetC71_2: C71.2 D14.3 P2.7 R64.2
NetC72_2: C72.2 D15.3 P2.9 R65.2
NetC73_1: C73.1 R66.2
NetC73_2: C73.2 D16.2 TP12.1 TR1.1 VT2.2
NetC74_1: C74.1 R67.1
NetC74_2: C74.2 D17.1 TP13.1 TR1.6 VT1.2
NetC75_1: C75.1 C78.2 R69.2 R70.2 R71.2 TP9.1 U19.13 U19.14
NetC79_1: C79.1 C80.2 R72.1 R73.2 R75.2 U19.3
NetC79_2: C79.2 C87.2 R70.1 R72.2 TP10.1 U19.2 U21.1 U21.2
NetC80_1: C80.1 C83.2 R69.1 R73.1 TP15.1 U19.15 U22.1 U22.2
NetC84_2: C84.2 U19.5
NetC85_2: C85.2 C86.1 L3.1 U19.12
NetC88_2: C88.2 R68.1 R82.2 TP11.1 U19.16
NetC89_2: C89.2 R88.1 U19.1
NetC90_2: C90.2 R88.2 R89.2 R90.2 TP18.1 VT1.3 VT2.3
NetC91_2: C91.2 C92.1 L4.2 P2.24
NetC94_2: C94.2 C95.2 FB9.1 U25.8
NetC96_2: C96.2 D8.3 R57.2 U16.25 U16.45
NetC97_2: C97.2 R56.1 R93.2 U25.1
NetC100_2: C100.2 C101.2 R22.2 R36.2 R54.2 R97.2 U18.1
NetD1_1: D1.1 L1.1 TP1.1 U1.2
NetD2_1: D2.1 R8.1
NetD5_1: D5.1 P2.26 Q1.3
NetD6_1: D6.1 P2.22 Q2.3
NetD9_1: D9.1 R59.1
NetD10_1: D10.1 R60.1
NetD11_1: D11.1 R61.1
NetD12_1: D12.1 R62.1
NetD13_1: D13.1 R63.1
NetD18_1: D18.1 R71.1
NetD18_2: D18.2 T2.3
NetD19_1: D19.1 D22.1 R91.1 R92.1
NetD19_2: D19.2 D20.1 TR1.13
NetD20_2: D20.2 D21.2 P3.4 P3.5
NetD21_1: D21.1 D22.2 TR1.7
NetJ1_1: J1.1 R2.2
NetJ1_2: J1.2 P1.1 R3.1 U3.11 U3.14 U5.2
NetJ2_2: J2.2 U16.76
NetJ2_3: J2.3 U16.77
NetJ2_4: J2.4 U16.90
NetP1_3: P1.3 R2.1 R10.2 U3.12 U3.13 U5.1
NetP2_2: P2.2 U16.1
NetP2_3: P2.3 R94.2
NetP2_4: P2.4 R43.1
NetP2_5: P2.5 R58.2
NetP2_6: P2.6 R40.1
NetP2_8: P2.8 R45.1
NetP2_10: P2.10 R44.1
NetP2_12: P2.12 R49.1
NetP2_13: P2.13 R21.1 U12.3
NetP2_14: P2.14 R48.1
NetP2_15: P2.15 R12.1 U10.3
NetP2_16: P2.16 R47.1
NetP2_17: P2.17 R27.1 U13.3
NetP2_18: P2.18 R46.1
NetP2_21: P2.21 R17.2
NetP2_23: P2.23 R15.2
NetP2_28: P2.28 R41.2
NetP2_30: P2.30 R50.2
NetP2_32: P2.32 R29.2
NetP2_34: P2.34 R26.2
NetP3_1: P3.1 P3.2 R91.2 R92.2
NetQ1_1: Q1.1 R32.2 R34.2
NetQ2_1: Q2.1 R33.2 R35.2
NetR1_2: R1.2 U1.1 U1.7 U1.8
NetR4_1: R4.1 TP6.1 U3.6 U16.55
NetR5_1: R5.1 TP7.1 U3.3 U16.56
NetR6_2: R6.2 R7.2 U1.5
NetR8_2: R8.2 R9.2 TP3.1 U3.4 U3.5 U16.57
NetR11_2: R11.2 U10.1 U10.4
NetR13_2: R13.2 R15.1 U11.2
NetR14_1: R14.1 U11.6 U11.7
NetR16_1: R16.1 R19.1 U11.5
NetR17_1: R17.1 R18.1 U11.3
NetR18_2: R18.2 U9.1 U9.4
NetR20_2: R20.2 U12.1 U12.4
NetR22_1: R22.1 U9.3
NetR23_2: R23.2 U13.1 U13.4
NetR24_2: R24.2 R26.1 U14.2
NetR25_1: R25.1 U14.6 U14.7
NetR28_1: R28.1 R30.1 U14.5
NetR29_1: R29.1 R31.1 U14.3
NetR31_2: R31.2 U15.1 U15.4
NetR32_1: R32.1
NetR33_1: R33.1
NetR36_1: R36.1 U15.3
NetR37_1: R37.1 R103.2 U17.4
NetR37_2: R37.2 U16.28
NetR38_2: R38.2 R41.1 U23.2
NetR39_1: R39.1 U23.6 U23.7
NetR40_2: R40.2 U16.69
NetR42_1: R42.1 R51.1 U23.5
NetR43_2: R43.2 U16.51
NetR44_2: R44.2 U16.70
NetR45_2: R45.2 U16.52
NetR46_2: R46.2 U16.71
NetR47_2: R47.2 U16.53
NetR48_2: R48.2 U16.72
NetR49_2: R49.2 U16.54
NetR50_1: R50.1 R53.1 U23.3
NetR53_2: R53.2 U24.1 U24.4
NetR54_1: R54.1 U24.3
NetR56_2: R56.2 R58.1 U25.2
NetR57_1: R57.1 U25.6 U25.7
NetR59_2: R59.2
NetR60_2: R60.2 U16.2
NetR61_2: R61.2 U16.3
NetR62_2: R62.2 U16.4
NetR63_2: R63.2 U16.5
NetR74_1: R74.1 R79.2 U19.4
NetR74_2: R74.2 R99.1 U27.1
NetR75_1: R75.1 R78.2 T2.1
NetR76_1: R76.1 U20.7
NetR76_2: R76.2 R84.2 TP14.1 VT2.1
NetR77_1: R77.1 U20.5
NetR77_2: R77.2 R83.2 TP16.1 VT1.1
NetR80_2: R80.2 U19.6
NetR81_1: R81.1 U19.9
NetR81_2: R81.2 R87.2 U20.2
NetR85_1: R85.1 U19.10
NetR85_2: R85.2 R86.2 U20.4
NetR93_1: R93.1 R95.1 U25.5
NetR94_1: R94.1 R96.1 U25.3
NetR96_2: R96.2 U26.1 U26.4
NetR97_1: R97.1 U26.3
NetR98_2: R98.2 R101.1 U17.3
NetR99_2: R99.2 R102.1 U27.4
NetR100_1: R100.1 U27.3
NetR100_2: R100.2 R103.1 U17.1
NetU8_2: U8.2 U16.83
NetU8_3: U8.3 U16.82
VCC: C14.1 C15.1 C76.2 C77.1 C81.2 C82.2 L3.2 L4.1 P2.1 R1.1 R66.1 R67.2 R68.2 TR1.3 TR1.4 U1.6 U19.8 U19.11 U20.1 U20.6 U20.8
pads on no net: P3.3 TR1.2 TR1.5 TR1.8 TR1.9 TR1.10 TR1.11 TR1.12 U8.1 U8.4 U8.6 U8.7 U16.7 U16.8 U16.9 U16.10 U16.11 U16.15 U16.16 U16.17 U16.18 U16.19 U16.22 U16.26 U16.27 U16.31 U16.32 U16.34 U16.38 U16.39 U16.41 U16.42 U16.43 U16.44 U16.46 U16.47 U16.50 U16.58 U16.59 U16.60 U16.61 U16.62 U16.65 U16.66 U16.67 U16.68 U16.73 U16.78 U16.79 U16.80 U16.81 U16.84 U16.85 U16.86 U16.87 U16.88 U16.89 U16.91 U16.92 U16.93 U16.94 U16.96 U16.97 U16.98

## Other copper
Top Layer:
  pour cut-out: 333.5,530.4 cw(c333.5,532.5) 331.4,532.5 cw(c333.5,532.5) 333.5,534.6 cw(c333.5,532.5) 335.6,532.5 cw(c333.5,532.5)

## Silkscreen, mask and mechanical layers (free items; w line width, h text height)
Mechanical 1:
  circle w0.013: c333.5,467.5 r2.1
  circle w0.013: c466.5,467.5 r2.1
  circle w0.013: c400,467.5 r2.1